# Altium PCB latest_Audio_Meter_V4.5.PcbDoc (part 4 of 4)
Units mil, origin at the board's own origin, x right, y up, seen from the top; angles counter-clockwise.
Board outline 2756.14 x 2519.69 mil, 2 copper layers (Top Layer, Bottom Layer), stack 57.087 mil thick; 115 components, 61 nets, 352 pads, 840 vias.
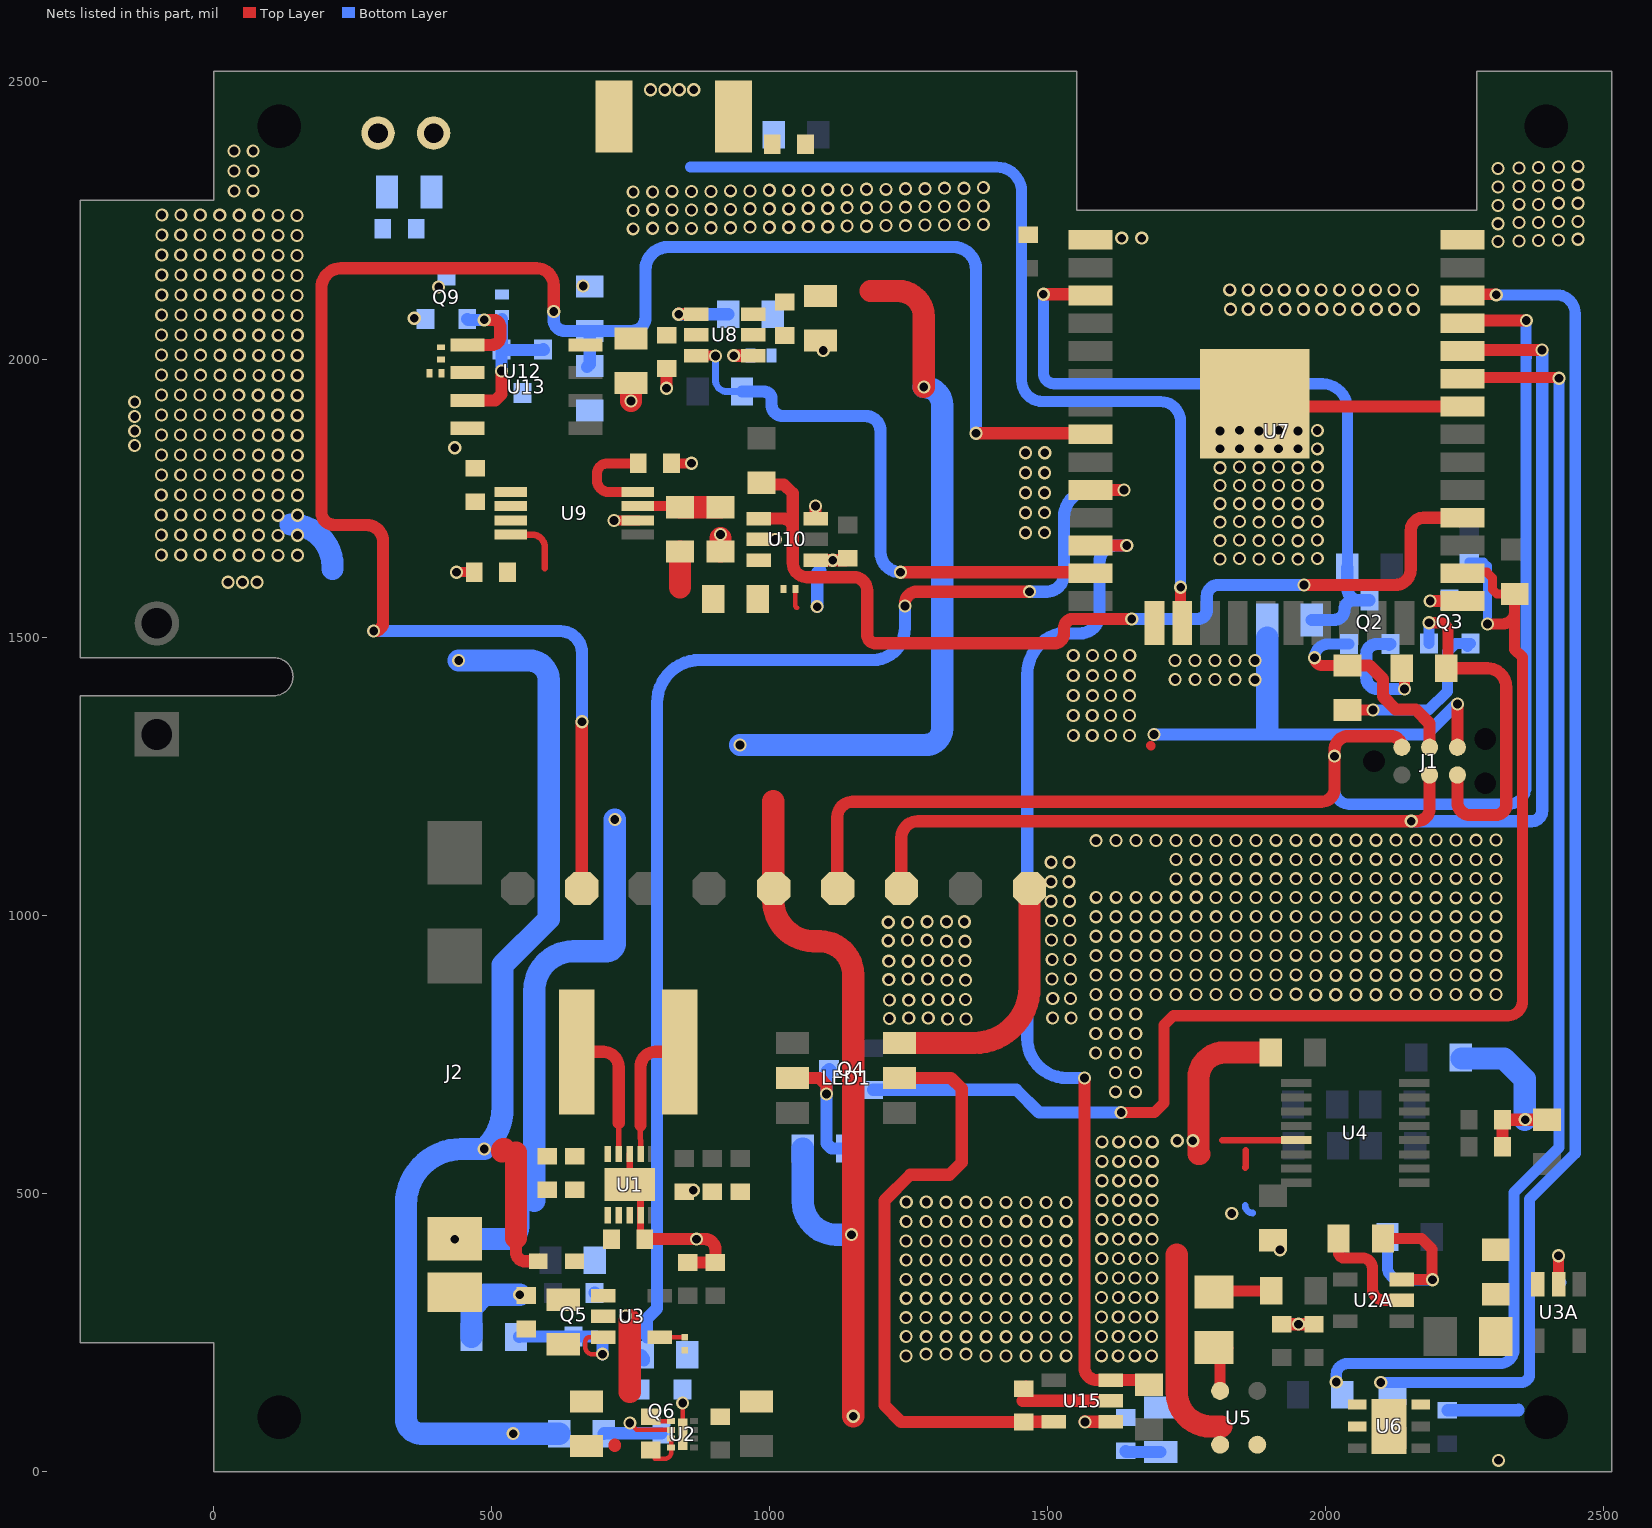
[diagram p2: the nets of this part, all layers, seen from the top]

## Via types
v1: diameter 23.62, hole 15.75, Top Layer to Bottom Layer, 821 vias
v2: diameter 23.62, hole 15.75, Top Layer to Bottom Layer, tented both sides, 19 vias

## Nets (pads, with @x,y where several pads share a name; then routed paths per layer and width w, separated by ;. In a path a pad name is that pad's centre, name@x,y a point inside that pad or via, vN(x,y) a via of type N, cw(c..) or ccw(c..) an arc to the next point about the centre after c; other vN are vias at no path point) (continued)
B_ADC: P8.1 R33.1 R34.1 U7.8 | length 3547.3
  Top Layer w22: 193.98,1757.63 ccw(c139,1759) 194,1759 ; v1(288,1512) 289,1512 ccw(c289,1528) 305,1528 305,1673 ccw(c275,1673) 275,1703 217,1703 cw(c217,1726) 194,1726 194,1759 ; v2(612,2087) 612,2134.17 ccw(c581.17,2134.17) 581.17,2165 229.7,2165 ccw(c229.7,2129.3) 194,2129.3 194,1759 ; P8.1@661.25,1049 P8.1@662.56,1050.31 ; v1@662.56,1349 P8.1@662.56,1050.31 ; P8.1@669,1056.75 P8.1@662.56,1050.31 ; v1(1372,1868) U7.8@1572.71,1868
  Top Layer w40: P8.1@662.56,1049 P8.1@662.56,1050.31
  Bottom Layer w22: v1(288,1512) 623.86,1512 cw(c623.86,1472.86) 663,1472.86 v1(663,1349) ; v2(612,2087) 612,2072 ccw(c632,2072) 632,2052 R34.1@677,2052 ; R33.1@672,1987 677,1992 R34.1@677,2052 ; v1(1372,1868) 1372,2162.27 ccw(c1331.27,2162.27) 1331.27,2203 818,2203 ccw(c818,2162) 777,2162 777,2075.8 cw(c753.2,2075.8) 753.2,2052 R34.1@677,2052
BATT_IN: C16.1 C17.1 C81.1 C82.1 J5.1 Q9.3 R30.2 R31.2 R34.2 U8.2 U13.8 | length 9.9
  Top Layer w22: C16.1@751,2038.57 cw(c757,2038.57) C16.1@757,2044.57 ; C17.1@815,2044.57 C17.1@815,2045
  other v1: 405,2131 665,2133
C_VIN: C34.1 C35.1 L2.2 R1#.2 U3.1 | length 148.9
  Bottom Layer w40: R1#.2@464,242 464,294 488,318 v1(551,318)
CHG: RC1.1 U7.13 U8.3 | length 1042.8
  Top Layer w18: U8.3@868.82,2007.6 903,2007.6 v2(903,2007)
  Top Layer w22: v1(1236,1618) U7.13@1572.71,1618
  Bottom Layer w12: v2(903,2007) 903,1963.75 ccw(c923.75,1963.75) 923.75,1943 RC1.1@951,1943
  Bottom Layer w22: RC1.1@951,1943 990,1943 cw(c990,1929) 1004,1929 1004,1919.29 ccw(c1024.29,1919.29) 1024.29,1899 1173,1899 cw(c1173,1872) 1200,1872 1200,1654 ccw(c1236,1654) v1(1236,1618)
CLED: LED1.2 Q4.3 R57.2 | length 263.7
  Top Layer w22: LED1.2@1041.54,708 1090,708 1103,695 v1(1103,679)
  Bottom Layer w22: Q4.3@1110.63,721 Q4.3@1107.63,724 1103,719.37 v1(1103,679) 1103,590 1112,581 R57.2@1140,581
CLED#: C76.2 Q4.2 R56.2 U7.26 | length 2432.6
  Top Layer w8: R56.2@2323,1579 R56.2@2341,1579
  Top Layer w12: R56.2@2323,1579 R56.2@2323,1588
  Top Layer w16: U7.26@2242,1618 2291,1618 2301,1608 2301,1587 2309,1579 R56.2@2323,1579
  Top Layer w20: v1(1633,646) 1693,646 1710,663 1710,803 1727,820 2329,820 ccw(c2329,846) 2355,846 2355,1465 2341,1479 2341,1546.94 ; U7.26@2242,1618 ccw(c2243,1618) U7.26@2243,1617 ; v1(2292,1525) 2319.06,1525 ccw(c2319.06,1546.94) 2341,1546.94 ; R56.2@2341,1579 2341,1546.94
  Bottom Layer w16: C76.2@2259,1636 2285,1636 2292,1629 v1(2292,1525)
  Bottom Layer w22: Q4.2@1186.37,686.6 1444.4,686.6 1485,646 v1(1633,646)
DTR: J1.5 Q3.2 RC2.2 | length 644.9
  Top Layer w20: v1(2187,1527) 2206.76,1527 cw(c2206.76,1512.76) 2221,1512.76 RC2.2@2221,1447
  Top Layer w22: RC2.2@2218,1445 2291.86,1445 cw(c2291.86,1410.86) 2326,1410.86 2326,1200.35 cw(c2306.65,1200.35) 2306.65,1181 2260.94,1181 cw(c2260.94,1203.94) 2238,1203.94 J1.5@2238,1253
  Bottom Layer w20: Q3.2@2186.6,1489.63 2186.6,1527 v1(2187,1527)
EN#: Q6.3 R4#.1 U2.6 | length 184.3
  Top Layer w8: v1(749,87) 761,75 823.33,75 U2.6@823.33,74.87
  Bottom Layer w10: R4#.1@702,68 R4#.1@702,68.63
  Bottom Layer w22: R4#.1@702,68 702.63,68.63 Q6.3@806,68.63
ENABLE: C78.1 Q2.3 R43.1 U7.3 | length 1285.7
  Top Layer w22: v1(1493,2118) U7.3@1572.71,2118
  Bottom Layer w20: v1(1493,2118) 1493,1976.63 ccw(c1512.63,1976.63) 1512.63,1957 1995,1957 cw(c1995,1912) 2040,1912 R43.1@2040,1626.44 ; 2012,1532 2015.9,1532
  Bottom Layer w22: C78.1@1976,1532 2012,1532 ; 2015.9,1532 ccw(c2015.9,1551.1) 2035,1551.1 cw(c2051.27,1551.1) 2051.27,1567.37 2060.94,1567.37 ; R43.1@2040,1626.44 2040,1588.31 ccw(c2060.94,1588.31) 2060.94,1567.37 ; Q2.3@2080,1567.37 2060.94,1567.37
GND: C1.2 C2.2 C3.2 C4.2 C7.2 C10.2 C11.2 C12.2 C13.2 C16.2 C17.2 C18.2 C19.2 C22.2 C25.2 C26.2 C27.2 C28.2 C29.2 C33.2 C34.2 C35.2 C37.2 C38.2 C40.2 C41.2 C78.2 C79.2 C80.2 C81.2 C82.2 C85.2 C#3.2 C#4.2 C#5.2 J1.6 J2.4 J5.2 LED1.6 P5.1 pad.MH1 pad.MH2 pad.MH3 pad.MH4 Q5.2 Q6.2 R3.2 R8.1 R10.1 R12.1 R14.1 R28.1 R29.1 R32.2 R33.2 R35.2 R36.2 R38.1 R39.2 R42.2 SW2.2 U1.3 U1.9 U1.11 U2.5 U2.9 U2A.2 U3.2 U3A.2 U4.5 U5.2 U5.3 U6.2 U6.7 U7.1 U7.15 U7.32 U7.38 U7.39 U8.5 U9.2 U9.5 U10.2 U10.4 U10.6 U12.3 U13.4 U15.2 | length 4708.9
  Top Layer w8: C26.2@796.94,90.62 U2.5@823.33,90.62 ; v1@841,123 844,120 U2.9@844,67 ; R42.2@1047,1588 1047,1557 ccw(c1050,1557) 1050,1554
  Top Layer w12: U1.3@748.63,571.24 748.63,532.37 768.31,512.69 768.31,507 U1.11@768.31,503 ; C10.2@768.31,420.69 U1.9@768.31,461 U1.11@768.31,502 ; 1815,596.2 U4.5@1947.75,596.2 ; 1856,547 ccw(c1856,548) 1857,548 1857,578
  Top Layer w16: 1686,1306 cw(c1686,1305) 1687,1305
  Top Layer w18: v2(437,1618) C79.2@469,1618 ccw(c467,1618) C79.2@467,1620 ; v1(720.44,1711) U9.2@764.97,1711 ; R39.2@826,1812 R39.2@824,1814 v2(860,1814)
  Top Layer w20: R3.2@2024,419 2024,395 ccw(c2035,395) 2035,384 2067,384 cw(c2067,366) 2085,366 2085,329 ccw(c2106,329) 2106,308 U2A.2@2138.18,308 ; U3A.2@2420,337.18 v1(2420,388)
  Top Layer w22: U1.11@763.31,507 ccw(c767.31,507) 767.31,503 U1.11@768.21,503 ; U1.11@768.31,502 ccw(c763.31,502) U1.11@768.21,503 ; U1.11@768.31,503 U1.11@768.21,503 ; C10.2@773,418 C10.2@776,418 v1(869,418) 884.25,418 cw(c884.25,399.25) 903,399.25 C38.2@903,376 C37.2@853,376 ; v1(815,1949) C17.2@815,1984.57 ; C12.2@896,502 cw(c897,502) C12.2@897,503 ; U8.5@971.18,2045 U8.5@980.85,2045 ; U10.2@980.82,1677 v1(1011,1677) ; v1(1083,1737) 1083.18,1736.82 U10.6@1083.18,1714.4 ; U10.4@1083.18,1639.6 v1(1114,1639.6) 1137.6,1639.6 ccw(c1137.6,1643) C85.2@1141,1643 ; 1456,127 U15.2@1614.18,127 ; C#3.2@1458,149 C#3.2@1462.02,153.02 ; U7.39@1873.65,1921.31 ccw(c1878.96,1921.31) 1878.96,1916 U7.32@2247.29,1916 ; C3.2@1922,265 v2(1952,265) C4.2@1980,265 ; U6.7@2115,46.77 U6.7@2115,81 ; J1.6@2238,1303 v1(2238,1381) ; C1.2@2319,584 C2.2@2319,631 ; C2.2@2319,633 v2(2360,633) R12.1@2399,633
  Top Layer w40: 749,143 v1@749,272 ; v1(751,1926) C16.2@751,1958.57 ; U1.11@763.31,507 U1.11@768.31,507 ; R38.1@912,1655 v1@912,1679 ; LED1.6@1234.46,770.99 1368,770.99 ccw(c1368,870.99) 1468,870.99 P5.1@1468,1049 ; 1733,390 1733,142.49 ccw(c1794.49,142.49) 1794.49,81 1813,81 ; 1774,571 cw(c1774,573) 1772,573 1772,707 cw(c1819,707) 1819,754 R8.1@1902,754 ; U7.39@1868.35,1923.31 ccw(c1873.67,1923.31) U7.39@1873.67,1918
  Bottom Layer w12: 1856,479 ccw(c1870,479) 1870,465
  Bottom Layer w20: 2420,344 ccw(c2424,344) 2424,340
  Bottom Layer w22: Q5.2@685.4,321.37 Q5.2@686,321.97 ; v1(1086,1556) 1086,1615 cw(c1092,1615) 1092,1621 ; C#5.2@1641,37 ccw(c1643,37) 1643,35 C#4.2@1704,35 ; v1(1692,1326) 2181.85,1326 2236.85,1381 v1(2238,1381) ; C7.2@2220,110 2347,110 ccw(c2347,111) 2348,111 ; R10.1@2244,745 ccw(c2246,745) R10.1@2246,743
  Bottom Layer w40: 139,1704 cw(c139,1629) 214,1629 214,1624 ; 1896,1337 1896,1500 ; R10.1@2246,743 2322,743 2359,706 v2@2359,633
  other v1: 2312,20 844,123 1246.02,207.67 1390.02,207.79 1426.02,207.79 1462.02,207.9 1498.02,207.9 1534.02,208.01 1597.44,208 1627.55,208 1657.66,208 1687.77,208 1282,211 1318,211 1354,211 1354.13,242.45 1390.13,242.45 1426.13,242.34 1462.13,242.23 1497.9,241.89 1533.9,242.01 1246.13,242.67 1282.13,242.56 1318.13,242.56 1597.55,243 1627.66,243 1657.77,243 1687.89,243 1246.01,276.67 1282.01,276.78 1318.01,276.56 1354.01,276.67 1390.01,276.78 1426.01,276.78 1462.01,276.89 1498.01,276.89 1534.01,277.01 1597.66,278 1627.77,278 1657.89,278 1688,278 741,280 1354.12,311.45 1390.12,311.45 1426.12,311.34 1462.12,311.23 1497.89,310.89 1533.89,311 1246.12,311.67 1282.12,311.56 1318.12,311.56 1597.77,313 1627.89,313 1658,313 1688.11,313 1246.01,345.67 1282.01,345.78 1318.01,345.56 1354.01,345.67 1390.01,345.78 1426.01,345.78 1462.01,345.89 1498.01,345.89 1534.01,346 1597.89,348 1628,348 1658.11,348 1688.22,348 1354.12,380.45 1390.12,380.45 1426.12,380.33 1462.12,380.22 1497.89,379.89 1533.89,380 1246.12,380.67 1282.12,380.56 1318.12,380.56 1598,383 1628.11,383 1658.22,383 1688.33,383 1919,399 1246,414.67 1282,414.78 1318,414.55 1354,414.67 1390,414.78 1426,414.78 1462,414.89 1498,414.89 1534,415 1598.11,418 1628.22,418 1658.33,418 1688.44,418 1246.11,449.67 1282.11,449.78 1318.11,449.78 1354.11,449.89 1390.11,449.89 1426.11,450 1462.11,450.11 1498.11,449.89 1534.11,450 1598.22,453 1628.33,453 1658.44,453 1688.55,453 1832,464 1317.99,484.44 1353.99,484.33 1389.99,484.22 1425.99,484.22 1461.99,484.11 1497.99,484.11 1533.99,484 1246.22,484.67 1282.22,484.78 1598.33,488 1628.44,488 1658.55,488 1688.67,488 863,506 1598.44,523 1628.55,523 1658.67,523 1688.78,523 1598.55,558 1628.67,558 1658.78,558 1688.89,558 1598.67,593 1628.78,593 1658.89,593 1689,593 1734,595 1762,595 1622.89,683 1658.89,683 1623,718 1659,718 1587.11,753 1623.11,753 1659.11,753 1587.22,788 1623.22,788 1659.22,788 1320.78,814 1354,814 1215.89,814.89 1250.89,816 1285.89,815.89 1509.78,816 1543,816 1587.33,823 1623.33,823 1659.33,823 1215.89,848.11 1250.89,848 1285.89,849.11 1320.89,849 1352.89,849 1509.89,851 1541.89,851 1587.44,858 1623.44,858 1659.44,858 1695.44,858 1731.44,858.11 1767.44,858.22 1803.44,858.22 1839.44,858.33 1875.44,858.33 1911.44,858.45 1983.22,857.55 2019.22,857.67 2055.22,857.78 2091.22,857.78 2127.22,857.89 2163.22,857.89 2199.22,858 2235.22,858.11 2271.22,857.89 2307.22,858 1947.44,858.56 1319.78,884 1353,884 1214.89,884.89 1249.89,886 1284.89,885.89 1508.78,886 1542,886 1587.55,893 1623.55,893 1659.55,893 1695.55,893 1731.55,893.11 1767.55,893.22 1803.55,893.22 1839.55,893.33 1875.55,893.33 1911.55,893.45 1983.33,892.55 2019.33,892.67 2055.33,892.78 2091.33,892.78 2127.33,892.89 2163.33,892.89 2199.33,893 2235.33,893.11 2271.33,892.89 2307.33,893 1947.55,893.56 1214.89,918.11 1249.89,918 1284.89,919.11 1319.89,919 1351.89,919 1508.89,921 1540.89,921 1587.67,928 1623.67,928 1659.67,928 1695.67,928 1731.67,928.11 1767.67,928.22 1803.67,928.22 1839.67,928.33 1875.67,928.33 1911.67,928.45 1983.44,927.55 2019.44,927.67 2055.44,927.78 2091.44,927.78 2127.44,927.89 2163.44,927.89 2199.44,928 2235.44,928.11 2271.44,927.89 2307.44,928 1947.67,928.56 1318.78,954 1352,954 1213.89,954.89 1248.89,956 1283.89,955.89 1507.78,956 1541,956 1587.78,963 1623.78,963 1659.78,963 1695.78,963 1731.78,963.11 1767.78,963.22 1803.78,963.22 1839.78,963.33 1875.78,963.33 1911.78,963.45 1983.55,962.55 2019.55,962.67 2055.55,962.78 2091.55,962.78 2127.55,962.89 2163.55,962.89 2199.55,963 2235.55,963.11 2271.55,962.89 2307.55,963 1947.78,963.56 1213.89,988.11 1248.89,988 1283.89,989.11 1318.89,989 1350.89,989 1507.89,991 1539.89,991 1587.89,998 1623.89,998 1659.89,998 1695.89,998 1731.89,998.11 1767.89,998.22 1803.89,998.22 1839.89,998.33 1875.89,998.33 1911.89,998.45 1983.66,997.55 2019.66,997.67 2055.66,997.78 2091.66,997.78 2127.66,997.89 2163.66,997.89 2199.66,998 2235.66,998.11 2271.66,997.89 2307.66,998 1947.89,998.56 1506.78,1026 1540,1026 2091.54,1032.44 2127.54,1032.33 2163.54,1032.22 2199.54,1032.22 2235.54,1032.11 2271.54,1032.11 2307.54,1032 1588,1033 1624,1033 1660,1033 1696,1033 1732,1033.11 1768,1033.22 1803.77,1032.89 1839.77,1032.78 1875.77,1032.67 1911.77,1032.67 1947.77,1032.55 1983.77,1032.55 2019.77,1032.67 2055.77,1032.78 1506.89,1061 1538.89,1061 1731.66,1066.22 1767.66,1066.33 1803.66,1066.33 1839.66,1066.44 1875.66,1066.44 1911.66,1066.55 1947.66,1066.55 1983.66,1066.66 2019.66,1066.66 2055.66,1066.77 2091.66,1066.77 2127.66,1066.89 2163.66,1066.89 2199.66,1067 2235.66,1067.11 2271.66,1066.89 2307.66,1067 1507,1096 1539,1096 1731.77,1101.22 1767.77,1101.33 1803.54,1100.99 1839.54,1100.88 1875.77,1101.44 1947.54,1101.22 1983.54,1101.11 2091.54,1101.44 2127.54,1101.33 2163.54,1101.22 2199.54,1101.22 2235.54,1101.11 2271.54,1101.11 2307.54,1100.99 1911.77,1101.55 2019.77,1101.66 2055.77,1101.77 1587.65,1134.99 1623.65,1135.1 1659.65,1135.1 1695.65,1135.22 1731.65,1135.22 1767.65,1135.33 1803.65,1135.33 1839.65,1135.44 1875.65,1135.44 1911.65,1135.55 1947.65,1135.55 1983.65,1135.66 2019.65,1135.66 2055.65,1135.77 2091.65,1135.77 2127.65,1135.88 2163.65,1135.88 2199.65,1135.99 2235.65,1136.11 2271.65,1135.88 2307.65,1135.99 1547,1324 1581,1324.12 1614,1324 1648,1324.12 1546.89,1360 1580.89,1360.12 1613.89,1360 1647.89,1360.12 1546.89,1396 1581.22,1395.89 1613.89,1396 1648.22,1395.89 1730.12,1425 1766.12,1425.11 1801.89,1424.78 1837.89,1424.67 1873.89,1424.56 1546.78,1432 1581.33,1431.89 1613.78,1432 1648.33,1431.89 1730,1459 1766,1459.11 1802,1459.11 1838,1459.22 1874,1459.22 1546.78,1468 1581.44,1467.89 1613.78,1468 1648.44,1467.89 26,1600 52,1600 78,1600 1951,1641.44 1811,1641.55 1881,1641.55 1846,1642.67 1916,1642.67 1986,1642.55 81,1648.44 116,1648.33 151,1648.44 -94,1649 -59,1648.89 -24,1648.78 11,1648.67 46,1648.55 1811,1674.78 1881,1674.78 1951,1674.67 1846,1675.89 1916,1675.89 1986,1675.78 81,1684.44 116,1684.33 151,1684.44 -94,1685 -59,1684.89 -24,1684.78 11,1684.67 46,1684.55 912,1686 1461,1689 1495,1689.12 1811,1708 1881,1708 1951,1707.89 1846,1709.11 1916,1709.11 1986,1709 80.89,1720.44 115.89,1720.33 151.11,1720.44 -94.11,1721 -59.11,1720.89 -24.11,1720.78 10.89,1720.67 45.89,1720.55 1460.89,1725 1494.89,1725.12 1811,1741.22 1846,1741.11 1881,1741.22 1916,1741.11 1951,1741.11 1986,1741 80.78,1756.44 115.78,1756.33 151.22,1756.44 -94.22,1757 -59.22,1756.89 -24.22,1756.78 10.78,1756.67 45.78,1756.55 1460.89,1761 1495.22,1760.89 1811,1774 1846,1773.89 1881,1774 1916,1773.89 1951,1773.89 1986,1773.78 80.78,1792.44 115.78,1792.33 150.89,1792.22 -93.89,1792.77 -59.22,1792.89 -24.22,1792.78 10.78,1792.67 45.78,1792.55 1460.78,1797 1495.33,1796.89 1811,1806 1881,1806 1951,1805.89 1846,1807.11 1916,1807.11 1986,1807 80.67,1828.44 115.67,1828.33 150.78,1828.22 -93.78,1828.77 -59.33,1828.89 -24.33,1828.78 10.67,1828.67 45.67,1828.55 1460.78,1833 1495.44,1832.89 1811,1840.13 1846,1840.02 1881,1840.13 1916,1840.02 1951,1840.02 1986,1839.91 434,1842 -142,1846 80.67,1864.44 115.67,1864.33 150.67,1864.22 -93.67,1864.77 -59.33,1864.89 -24.33,1864.78 10.67,1864.67 45.67,1864.55 -142,1872 1811,1872.13 1881,1872.13 1951,1872.02 1846,1873.24 1916,1873.24 1986,1873.13 -142,1898 80.55,1900.44 115.55,1900.33 150.67,1900.22 -93.67,1900.77 -59.45,1900.89 -24.45,1900.78 10.55,1900.67 45.55,1900.55 -142,1924 80.44,1936.44 115.44,1936.33 150.55,1936.22 -93.55,1936.77 -59.56,1936.89 -24.56,1936.78 10.44,1936.67 45.44,1936.55 11.45,1972.44 46.45,1972.33 81.45,1972.22 116.45,1972.1 150.55,1972.22 -93.55,1972.77 -58.55,1972.66 -23.55,1972.55 11.33,2008.44 46.33,2008.33 81.33,2008.22 116.33,2008.1 150.67,2008.22 -93.67,2008.77 -58.67,2008.66 -23.67,2008.55 11.22,2044.44 46.22,2044.33 81.22,2044.22 116.22,2044.1 150.78,2044.22 -93.78,2044.77 -58.78,2044.66 -23.78,2044.55 11.22,2080.44 46.22,2080.33 81.22,2080.22 116.22,2080.1 150.44,2079.99 -93.44,2080.54 -58.78,2080.66 -23.78,2080.55 1829.55,2091 1861.55,2091 1894.33,2091 1927.55,2091 1960.78,2091 1994,2091 2026,2091 2058.78,2091 2092,2091 2125.22,2091 2158.45,2091 11.11,2116.44 46.11,2116.33 81.11,2116.22 116.11,2116.1 150.33,2115.99 -93.33,2116.54 -58.89,2116.66 -23.89,2116.55 1828.44,2126 1861.67,2126 1894.44,2126 1926.44,2126 1959.67,2126 1992.89,2126 2026.11,2126 2058.89,2126 2090.89,2126 2124.11,2126 2157.33,2126 11.11,2152.44 46.11,2152.33 81.11,2152.22 116.11,2152.1 150.22,2151.99 -93.22,2152.54 -58.89,2152.66 -23.89,2152.55 11,2188.44 46,2188.33 81,2188.22 116,2188.1 150.22,2187.99 -93.22,2188.54 -59,2188.66 -24,2188.55 2311,2213 2349,2213.89 2384,2215 2420,2215.89 2455,2217 1634,2219 1670,2219 10.89,2224.44 45.89,2224.33 80.89,2224.22 115.89,2224.1 150.11,2223.99 -93.11,2224.54 -59.11,2224.66 -24.11,2224.55 755,2235.78 790,2236.89 825,2236.78 860,2236.67 895,2237.78 930,2237.67 965,2238.78 1000,2238.67 1035,2238.55 1070,2239.67 1105,2239.55 1140,2240.67 1175,2240.55 1210,2241.67 1245,2241.55 1280,2242.67 1315,2242.55 1350,2243.67 1385,2243.55 2311,2245 2349,2247.11 2384,2247 2420,2249.11 2455,2249 11.11,2260.44 46.11,2260.33 81.11,2260.22 116.11,2260.1 150.11,2259.99 -93.11,2260.54 -58.89,2260.66 -23.89,2260.55 755,2269 790,2270.11 825,2270 860,2269.89 895,2271 930,2270.89 965,2272 1000,2271.89 1035,2271.78 1070,2272.89 1105,2272.78 1140,2273.89 1175,2273.78 1210,2274.89 1245,2274.78 1280,2275.89 1315,2275.78 1350,2276.89 1385,2276.78 2311,2277.78 2349,2279.89 2384,2279.78 2420,2281.89 2455,2281.78 755,2302.22 790,2302.11 825,2303.22 860,2303.11 895,2303 37,2304 71,2304.12 930,2304.11 965,2304 1000,2305.11 1035,2305 1070,2304.89 1105,2306 1140,2305.89 1175,2307 1210,2306.89 1245,2308 1280,2307.89 1315,2309 1350,2308.89 1385,2310 2311,2311 2349,2311.89 2384,2313 2420,2313.89 2455,2315 36.89,2340 70.89,2340.12 2311,2344.22 2349,2345.11 2384,2346.22 2420,2347.11 2455,2348.22 36.89,2376 71.22,2375.89
  other v2: 1097,2017
ILIM#: R39.1 U9.4 | length 181.9
  Top Layer w18: U9.4@763.17,1762.39 710.61,1762.39 cw(c710.61,1783) 690,1783 690,1795.25 cw(c708.75,1795.25) 708.75,1814 R39.1@764,1814
IN+: R30.1 U12.1 U12.2 U13.3 | length 278.9
  Top Layer w22: U13.3@456.7,1927 507,1927 518,1938 v1(518,1980)
  Bottom Layer w22: v1(518,1980) 518.2,1980.2 U12.1@518.2,2019 ; R30.1@519,2073 519,2019.8 U12.1@518.2,2019 ; U12.2@593,2019 594,2018 519.2,2018 U12.1@518.2,2019
IN-: R31.1 R32.1 U13.2
IO_0: Q3.3 U7.25 | length 104.5
  Top Layer w20: U7.25@2242,1568 2244,1566 U7.25@2249,1561
  Top Layer w22: v1(2189,1566) 2244,1566 U7.25@2247.29,1566
  Bottom Layer w22: v1(2189,1566) 2221.63,1566 ccw(c2221.63,1568.37) Q3.3@2224,1568.37
ISET: R28.2 U8.4 | length 66.1
  Top Layer w22: v2(936,2007.6) U8.4@971.18,2007.6
  Bottom Layer w12: v2(936,2007.6) 936,2008 R28.2@966.5,2008
LED#: R83.2 U7.12 U15.3 | length 1871.4
  Top Layer w22: v1(1567,708) 1567,187.1 ccw(c1589.7,187.1) 1589.7,164.4 U15.3@1614.18,164.4 1674.6,164.4 cw(c1674.6,156) R83.2@1683,156 R83.2@1682.4,155.4 ; U7.12@1578,1666 v1(1643,1666)
  Bottom Layer w22: v1(1567,708) 1535,708 cw(c1535,779) 1464,779 1464,1434 cw(c1540,1434) 1521.15,1507.62 1558.44,1507.62 ccw(c1558.44,1543.19) 1594,1543.19 1594,1636 cw(c1624,1636) 1624,1666 v1(1643,1666)
NetC8_2: C8.2 R1.1 | length 104.1
  Top Layer w20: C8.2@1800,323 cw(c1802,323) 1802,325 R1.1@1903,325
NetC9_2: C9.2 R6.2
NetC33_1: C33.1 U3.4 | length 55.8
  Top Layer w8: U3.4@796.19,234.61 cw(c803.18,234.61) U3.4@803.18,241.6 C33.1@848,241.6
NetL1_1: L1.1 U1.4 | length 247.3
  Top Layer w10: U1.4@728.94,571.24 728.94,627
  Top Layer w22: L1.1@653.48,755 701,755 cw(c701,727) 729,727 729,627
NetL1_2: L1.2 U1.2 | length 242.4
  Top Layer w10: 768,623 U1.2@768.32,571.24
  Top Layer w22: 768,623 768.32,705.96 768.32,728 cw(c795.31,728) 795.31,755 L1.2@838.52,755
NetQ2_1: Q2.1 RC2.1 | length 219.2
  Top Layer w20: RC2.1@2138,1445 2143,1440 v1(2143,1408)
  Bottom Layer w20: Q2.1@2115,1486.23 cw(c2117.4,1486.23) Q2.1@2117.4,1488.63
  Bottom Layer w22: Q2.1@2117.4,1488.63 2092.63,1488.63 ccw(c2092.63,1470) 2074,1470 2074,1428.29 ccw(c2094.29,1428.29) 2094.29,1408 v1(2143,1408)
NetQ3_1: Q3.1 RC3.1 | length 332.2
  Top Layer w20: RC3.1@2047,1363 cw(c2047,1370) RC3.1@2040,1370 v1(2086,1370)
  Bottom Layer w20: v1(2086,1370) 2186.26,1370 2220,1403.74 2220,1475 2234.63,1489.63 Q3.1@2261.4,1489.63 ccw(c2261.4,1484.23) Q3.1@2256,1484.23
NetQ9_1: Q9.1 U13.1 | length 152.4
  Top Layer w22: U13.1@456.7,2027 501,2027 ccw(c501,2042) 516,2042 516,2058.52 ccw(c502.52,2058.52) 502.52,2072 v1(487,2072)
  Bottom Layer w22: Q9.1@456.4,2073.63 458.03,2072 v1(487,2072)
NetR2_1: R2.1 R3.1 U2A.3 | length 353.8
  Top Layer w20: R3.1@2104,419 2173,419 2192,400 v1@2192,345.4 ; U2A.3@2138.18,345.4 v1@2192,345.4 ; v1(2193,345) 2192,345 v1@2192,345.4
  Bottom Layer w20: R2.1@2112,422 2112,368 ccw(c2135,368) 2135,345 v1(2193,345)
NetR6_1: R6.1 U3A.3
ON/OFF#: Q5.3 R1#.1 U3.3 | length 261.8
  Top Layer w8: v1(700,211) 680.9,211 cw(c680.9,222.9) 669,222.9 669,234 cw(c676.6,234) 676.6,241.6 U3.3@700.82,241.6
  Bottom Layer w22: R1#.1@550,242 550,242.63 Q5.3@648,242.63 687.1,242.63 cw(c687.1,229.73) 700,229.73 v1(700,211)
OUT_MIC: C8.1 U5.4 | length 106.2
  Top Layer w20: C8.1@1800,223 cw(c1800,211.93) 1811.07,211.93 C8.1@1811.07,208.07 ; U5.4@1811.07,145 C8.1@1811.07,208.07 ; C8.1@1825,222 ccw(c1825,208.07) C8.1@1811.07,208.07
P_D: C10.1 U1.6 U1.7 U1.8
RTS: J1.4 Q2.2 RC3.2 | length 395.4
  Top Layer w20: v1(1981,1464) ccw(c1995,1464) 1995,1450 RC3.2@2040,1450
  Top Layer w22: RC3.2@2040,1450 2080,1450 2104,1426 2104,1394.16 2127.16,1371 2163,1371 2188,1346 J1.4@2188,1303
  Bottom Layer w20: v1(1981,1464) cw(c2005.63,1464) 2005.63,1488.63 Q2.2@2042.6,1488.63
RX: J1.3 P7.1 U7.34 | length 2356.5
  Top Layer w22: P7.1@1237.5,1049 1237.5,1140.28 cw(c1267.23,1140.28) 1267.23,1170 v1(2155,1170) 2165.06,1170 ccw(c2165.06,1192.94) 2188,1192.94 J1.3@2188,1253 ; U7.34@2242,2018 v1(2390,2018) v1@2391,2018
  Bottom Layer w22: v1(2155,1170) 2371.52,1170 ccw(c2371.52,1188.98) 2390.5,1188.98 2390.5,2017.5 v1(2390,2018)
S_REG: Q6.1 R35.1 U7.10 | length 2346.8
  Top Layer w22: v1(1244,1557) 1244,1561 cw(c1266,1561) 1266,1583 v1(1468,1583) ; U7.10@1578,1766 v1(1638,1766)
  Bottom Layer w22: R35.1@764.33,210 cw(c764.33,199.73) R35.1@774.6,199.73 ; 780,241 780,275 798,293 798,1383 cw(c875,1383) 875,1460 1186.13,1460 ccw(c1186.13,1517.87) 1244,1517.87 v1(1244,1557) ; v1(1468,1583) 1499.27,1583 ccw(c1499.27,1613.73) 1530,1613.73 1530,1716.51 cw(c1579.49,1716.51) 1579.49,1766 v1(1638,1766)
S_SENS: R55.2 U7.28 U10.1 | length 1758
  Top Layer w22: U10.1@980.41,1714.81 U10.1@980.82,1714.4 1024.6,1714.4 cw(c1024.6,1697) 1042,1697 ; R55.2@986,1779 986,1776 1026,1776 1042,1760 1042,1697 ; v1(1652,1534) 1547,1534 ccw(c1547,1517) 1530,1517 1530,1507.07 cw(c1512.93,1507.07) 1512.93,1490 1191.66,1490 cw(c1191.66,1505.66) 1176,1505.66 1176,1585 ccw(c1152,1585) 1152,1609 1068,1609 cw(c1068,1635) 1042,1635 1042,1697 ; v1(1962,1595) 2126,1595 ccw(c2126,1623) 2154,1623 2154,1692.52 cw(c2177.48,1692.52) 2177.48,1716 U7.28@2247.29,1716
  Bottom Layer w22: v1(1652,1534) 1771.34,1534 ccw(c1771.34,1549.66) 1787,1549.66 1787,1574 cw(c1808,1574) 1808,1595 v1(1962,1595)
SCL_: R5.1 U6.6 U7.36 | length 2444.8
  Top Layer w20: U7.36@2242,2118 v1@2307,2118
  Bottom Layer w20: v1(2100,160) 2352.53,160 ccw(c2352.53,175.47) 2368,175.47 2368,490 2450,572 2450,2083.05 ccw(c2416.05,2083.05) 2416.05,2117 v1(2308,2117)
SDA_: R4.1 U6.1 U7.33 | length 2318.8
  Top Layer w20: U7.33@2242,1968 v1@2421,1968
  Bottom Layer w20: v1(2020,161) 2020,174 cw(c2040,174) 2040,194 2314,194 ccw(c2314,220) 2340,220 2340,501.6 2421,582.6 v1(2421,1967)
SENSE#: R40.1 R42.1 U10.3 | length 2
  Top Layer w12: R40.1@977,1570 R40.1@979,1570
SOFT_P: C25.1 R24.1 SW2.1 U7.16 | length 1650.6
  Top Layer w20: U7.16@1737.67,1528.63 ccw(c1737.67,1530.96) 1740,1530.96 v1(1740,1591)
  Bottom Layer w20: 858,2347 1409,2347 cw(c1409,2302) 1454,2302 1454,1963 ccw(c1492,1963) 1492,1925 1704,1925 cw(c1704,1889) 1740,1889 v1(1740,1591)
  other v1: 786,2486 812,2486 838,2486 864,2486
TS: R29.2 U8.1 | length 122.4
  Top Layer w22: v2@837,2083 837,2082.4 U8.1@868.82,2082.4
  Bottom Layer w22: v2@836,2082 R29.2@926,2082
  other v2: 837,2082
TX: J1.2 P6.1 U7.35 | length 2669.1
  Top Layer w22: P6.1@1122.25,1049 1122.25,1177 cw(c1150.25,1177) 1150.25,1205 1993.51,1205 ccw(c1993.51,1228.49) 2017,1228.49 v1(2017,1287) 2017,1298 cw(c2042,1298) 2042,1323 2118,1323 cw(c2118,1303) J1.2@2138,1303 ; U7.35@2244,2066 cw(c2244,2068) 2242,2068 2245,2071 v1(2362,2071)
  Bottom Layer w20: v1(2017,1287) 2017,1226.92 ccw(c2043.37,1226.92) 2043.37,1200.55 2329.83,1200.55 ccw(c2329.83,1232.22) 2361.5,1232.22 2361.5,1415.5 ; 2361.5,1416.5 2361.5,2004.76 ; v1(2362,2071) 2361.5,2070.5 2361.5,2030.24 2361.19,2029.93 2361.19,2006.07 2362.5,2004.76
VBAT: C80.1 Q9.2 U9.6
  other v1: 361,2075
VBUS: C18.1 C19.1 C79.1 C#4.1 C#5.1 J2.3 P2.1 R37.2 R40.2 R57.1 U8.6 U9.8 U15.1 | length 3871.1
  Top Layer w12: U9.8@534.83,1685.61 572.91,1685.61 cw(c572.91,1662.52) 596,1662.52 596,1625
  Top Layer w22: C79.1@529,1612 C79.1@529,1618 ; v1@1568,90.6 1567,89.6 U15.1@1614.18,89.6
  Top Layer w40: 839,1591 R37.2@839,1655 ; 1007,1206 1007,1027.4 ccw(c1080.4,1027.4) 1080.4,954 1090.15,954 cw(c1090.15,893.15) 1151,893.15 v2(1151,99.27) ; 1182,2124 1231.51,2124 cw(c1231.51,2077.51) 1278,2077.51 v2(1278,1951)
  Bottom Layer w40: v1(434,418) 525.88,418 ccw(c525.88,440.12) 548,440.12 548,487 ; 577,487 577,865 cw(c648,865) 648,936 707,936 ccw(c707,951) 722,951 v1(722,1173) ; v2(947,1307) 1281,1307 ccw(c1281,1337) 1311,1337 1311,1918 ccw(c1278,1918) v2(1278,1951) ; R57.1@1060,581 1060,486.82 ccw(c1120.82,486.82) 1120.82,426 v2(1148,426)
  other v1: 1568,89
VDD#: C#3.1 LED1.5 U15.5 | length 1106.2
  Top Layer w22: LED1.5@1234.46,708 1327,708 1346,689 1346,556 1324,534 1253.4,534 1207,487.6 1207,119 1237,89 C#3.1@1458,89 1458,89.6 U15.5@1511.82,89.6
VIN: C11.1 C26.1 C27.1 C40.1 L2.1 R4#.2 U1.5 U2.7 U2.8 U9.7 | length 2241.1
  Top Layer w8: 794,23 812.53,23 ccw(c812.53,33.8) 823.33,33.8 U2.8@823.33,43.38 U2.7@823.33,58.13
  Top Layer w22: 544,420 544,394.93 ccw(c560.93,394.93) 560.93,378 L2.1@584.52,378 ; 722,46 722,48
  Top Layer w40: 519,576 cw(c523,576) 523,580 ; 544,420 544,574
  Bottom Layer w40: v1(441,1459) 568,1459 cw(c568,1424) 603,1424 603,994 520,911 520,654.42 cw(c420,654.42) 490.71,583.71 v2(487,580) 446,580 ccw(c446,480) 346,480 346,96 ccw(c374,96) 374,68 v1(539,68) R4#.2@622,68
VSNS: R37.1 R38.2 U9.3 | length 147
  Top Layer w18: U9.3@764.97,1737 R37.1@839,1737
  Top Layer w40: R37.1@839,1735 R38.2@912,1735
pads on no net: J1.MP5 J1.MP6 J1.MP7 LED1.1 LED1.3 LED1.4 U2.3 U4.4 U4.12 U6.3 U6.4 U7.4 U7.5 U7.6 U7.9 U7.14 U7.17 U7.18 U7.19 U7.20 U7.21 U7.22 U7.23 U7.24 U7.29 U9.1 U13.5 U13.6 U13.7 U15.4

## Polygon pours and split planes (outlines as drawn)
GND on Top Layer "Bottom Layer-GND" (hatched 45Degree grid 25 track 12, remove dead copper, pour order 2): -163,1624 -163,2252 56,2252 56,2460 1421,2460 1421,2214 2314,2214 2314,2460 2492,2460 2492,92 591,92 591,1624
no net on Top Layer "Top Layer-No Net" (solid, pour order 4): 329,1584
GND on Bottom Layer "Bottom Layer-GND" (hatched 45Degree grid 25 track 12, remove dead copper, pour order 0): -170,1624 -170,2240 49,2240 49,2448 1414,2448 1414,2202 2395,2202 2395,2448 2485,2448 2485,80 680,80 680,1624

## Other copper
Top Layer:
  rectangle net GND: -10,1580 115,1667
  rectangle net GND: -5,1648.67 11,1663
  rectangle net GND: 533,219 633,262
  rectangle net VIN: 415,1432 482,1588
  rectangle net VIN: 328,1537 482,1588
  rectangle net GND: 1795,6 1992,104
  rectangle net GND: 1957,60 2130,97
  rectangle net 3V3: 989,445 1059,610
  rectangle net GND: 894,83 1012,113
  rectangle net VIN: 490,53 701,79
  rectangle net VIN: 328,1551 368,1719
  rectangle net 3V3: 1651,43 1708,102
  rectangle net GND: 1001,1919 1208,2059
  rectangle net GND: 948,2029 1127,2059
  rectangle net VBUS: 948,2067 1209,2182
  rectangle net 3V3_Audio: 781,269 956,334
  rectangle net GND: 831,149 1012,224
  rectangle net GND: 580,486 982,532
  rectangle net BATT_IN: 390,2017 419,2144
  rectangle net 3V3_SENS: 894,8 1013,69
  rectangle net GND: 1271,116 1477,508
  rectangle net 3V3_SENS: 947,13 1008,68
  rectangle net 3V3_Audio: 1862,111 1977,224
  rectangle net 3V3: 1033,1794 1207,1884
  rectangle net 3V3: 1115,1691 1241,1883
  rectangle net BATT_IN: 637,2008 818,2158
  rectangle net BATT_IN: 637,2027 896,2063
  rectangle net #OUT_MIC: 1985,537 2125,717
  rectangle net GND: 1039,2197 1195,2505
  rectangle net VIN: 448,1702 565,1720
  rectangle net VBAT: 477,1728 565,1746
  rectangle net VIN: 328,1678 483,1720
  rectangle net VIN: 468,553 715,608
  rectangle net P_D: 695,399 754,477
  rectangle net 3V3: 803,539 1031,558
  rectangle net 3V3: 782,445 1022,479
  rectangle net 3V3: 782,553 1043,610
  rectangle net GND: 505,1753 604,1905
  rectangle net GND: 389,1788 535,1905
  rectangle net GND: 333,1788 394.35,1984
  rectangle net VBAT: 250,2024 369,2101
  rectangle net VBAT: 224,1728 296,2101
  rectangle net VBAT: 245,1728 489,1761
  rectangle net IN-: 402,1948 497,2007
  rectangle net 3V3_SENS: 947,6 1775,31
  rectangle net GND: 833,171 1012,173
  rectangle net GND: 323,106 1012,190
  rectangle net VBUS: 888,1157 1027,1519
  rectangle net VBUS: 846,1157 920,1601
  rectangle net VBUS: 694,1157 874,1600
  rectangle net VBUS: 502,1406 708,1636
  rectangle net GND: 1045,1272 1705,1439
  rectangle net SENSE#: 997,1545 1032,1608
  rectangle net SENSE#: 947,1545 1024,1655
  rectangle net 3V3: 1115,1668 1429,1783
  rectangle net 3V3: 1060,1665 1429,1691
  rectangle net GND: 1043,1272 1145,1575
  rectangle net GND: 2083,20 2148,131
  rectangle net GND: 1987,6 2327,25
  rectangle net GND: 1668,369 2076,444
  rectangle net #15-P: 1879,460 2121,529
  rectangle net GND: 678,265 769,294
  rectangle net VIN: 490,9 806,62
  rectangle net GND: 381,220 487,359
  rectangle net GND: 75,106 658,229
  rectangle net C_VIN: 542,285 670,350
  rectangle net C_VIN: 619,302 725,392
  rectangle net GND: 104,2192 1195,2355
  rectangle net GND: 1631,369 1865,610
  rectangle net 3V3: 1644,2018 1684,2182
  rectangle net 3V3: 1398,2147 1684,2184
  rectangle net GND: 1668,1615 2073,1890
  rectangle net GND: 1674,1272 1711,1890
  rectangle net GND: 1098,2198 2290,2241
  rectangle net #_OUT_MIC: 1955,292 2004,360
  rectangle net NetR6_1: 2273,357 2395,425
  rectangle net NetC9_2: 2272,201 2345,342
  rectangle net #OUT_MIC: 2114,203 2241,286
  rectangle net #_OUT_MIC: 1955,292 2058,360
  rectangle net SCL_: 2155,108 2193,175
  rectangle net SCL_: 2083,146 2190,175
  rectangle net SDA_: 2000,111 2076,175
  rectangle net GND: 531,2331 754,2506
  rectangle net SOFT_P: 769,2370 1025,2505
  pour cut-out: 559,397.79 559,355 675,355 676,356 675,357 675,400 556.79,400
  pour cut-out: 616,885 616,624 874,624 874,885
Bottom Layer:
  rectangle net VBUS: 528,466 597,527
  rectangle net GND: 838,8 1659,52
  rectangle net GND: 986,1995 1317,2175
  rectangle net GND: 238,1789 829,1961
  rectangle net 3V3: 952,748 1429,779
  rectangle net VBUS: 1133,78 1737,135
  rectangle net GND: 2299,5 2441,134
  rectangle net VBAT: 346,1972 412,2092
  rectangle net A_REG: 585,276 656,450
  rectangle net S_REG: 728,127 801,257
  rectangle net #_OUT_MIC: 2015,303 2067,578
  rectangle net GND: 2385,5 2454,398
  rectangle net 3V3: 2100,1597 2234,1713
  rectangle net GND: 663,270 752,419
  rectangle net 3V3_SENS: 1931,7 2240,82
  rectangle net GND: 830,8 882,532
  rectangle net GND: 261,1605 1126,1842
  rectangle net GND: 1593,254 1983,488
  rectangle net GND: 239,2315 332,2508
  rectangle net GND: 10,2304 86,2385
  rectangle net GND: 10,1606 332,2509
  rectangle net 3V3: 1398,748 1429,2182
  rectangle net GND: 2388,320 2450,360
  rectangle net 3V3: 2099,1660 2285,2063
  rectangle net 3V3: 1596,2001 2279,2063
  rectangle net GND: 1595,2087 1682,2241
  rectangle net #_OUT_MIC: 1984,553 2114,699
  rectangle net SCL_: 2078,104 2147,176
  rectangle net SDA_: 2000,104 2068,176
  rectangle net SOFT_P: 768,2337 1036,2506
  rectangle net BATT_IN: 349,2107 729,2510

## Silkscreen, mask and mechanical layers (free items; w line width, h text height)
Top Overlay:
  drawing of 27 lines, arcs and shapes, not listed
  text "#" at 1090,2364 h80
  text "#" at 1004,2131 h80
  text "#" at 1442,2074 h80
  text "#" at 787,2072 h80
  text "# >> 0.1uf" at -236,1989.06 h80
  text "#" at 447,1645 h80
  text "#" at 1170,1621 h80
  text "#" at 554,1577 h80
  text "AC_LINE" at 587,1099 h65 r90
  text "B_ADC" at 703.75,1099 h65 r90
  text "AC_NEUTRAL" at 812,1099 h65 r90
  text "3V3" at 929,1099 h65 r90
  text "VBUS" at 1045,1099 h65 r90
  text "TX" at 1164.75,1099 h65 r90
  text "RX" at 1280.5,1099 h65 r90
  text "#O_MIC" at 1389,1099 h65 r90
  text "GND" at 1512,1099 h65 r90
  text "#" at 2291,660 h80
  text "#" at 2292,491 h80
  text "#" at 525,486 h80
  text "#" at 977,481 h80
  text "#" at 865,400 h80 r90
  text "#" at 931,333 h80
  text "#" at 1847,222 h80
  text "#" at 2072,184 h80 r90
  text "#" at 936,124.56 h80 r90
  text "#" at 1382.56,68 h80
  text "#" at 712,18 h80
Bottom Overlay:
  drawing of 3088 lines, arcs and shapes, not listed
  text "GND" at 332,2443 h65
  text "BATT_IN" at 628,2443 h65
  text "#" at 230,2213 h80
  text "#" at 2287,1614 h80
  text "AC_NEUTRAL" at 353,1488 h65
  text "AC_LINE" at 203.8,1284 h65
  text "#" at 1614,63 h80 r90
  text "#" at 2249,30 h80
  text "ZERO CARBON FOOTPRINT" at 1600,6 h38
Top Solder:
  rectangle: 1774,2002 1971,2224
Mechanical 13:
  lines w10: -240.16,231.28 -240.16,1396 109,1396 ccw(c109,1430) 143,1430 ccw(c109,1430) 109,1464 -240.16,1464 -240.16,2287.03 0,2287.03 0,2519 390,2519 1089,2519 1553,2519 1553,2269 2273,2269 2273,2519 2515.98,2519 2515.98,-0.68 0,-0.69 0,231.28 -240.16,231.28 ; 226,1018 ccw(c249,1018) 249,995 478,995 ccw(c478,1018) 501,1018 ccw(c478,1018) 478,1041 249,1041 ccw(c249,1018) 226,1018